# Altium PCB Flight Controller SoM.PcbDoc (part 2 of 3)
Units mm, origin at the board's own origin, x right, y up, seen from the top; angles counter-clockwise.
Board outline 55 x 40 mm, 8 copper layers (L1, L2, L3, L4, L5, L6, L7, L8), stack 1.028 mm thick; 176 components, 217 nets, 863 pads, 595 vias.
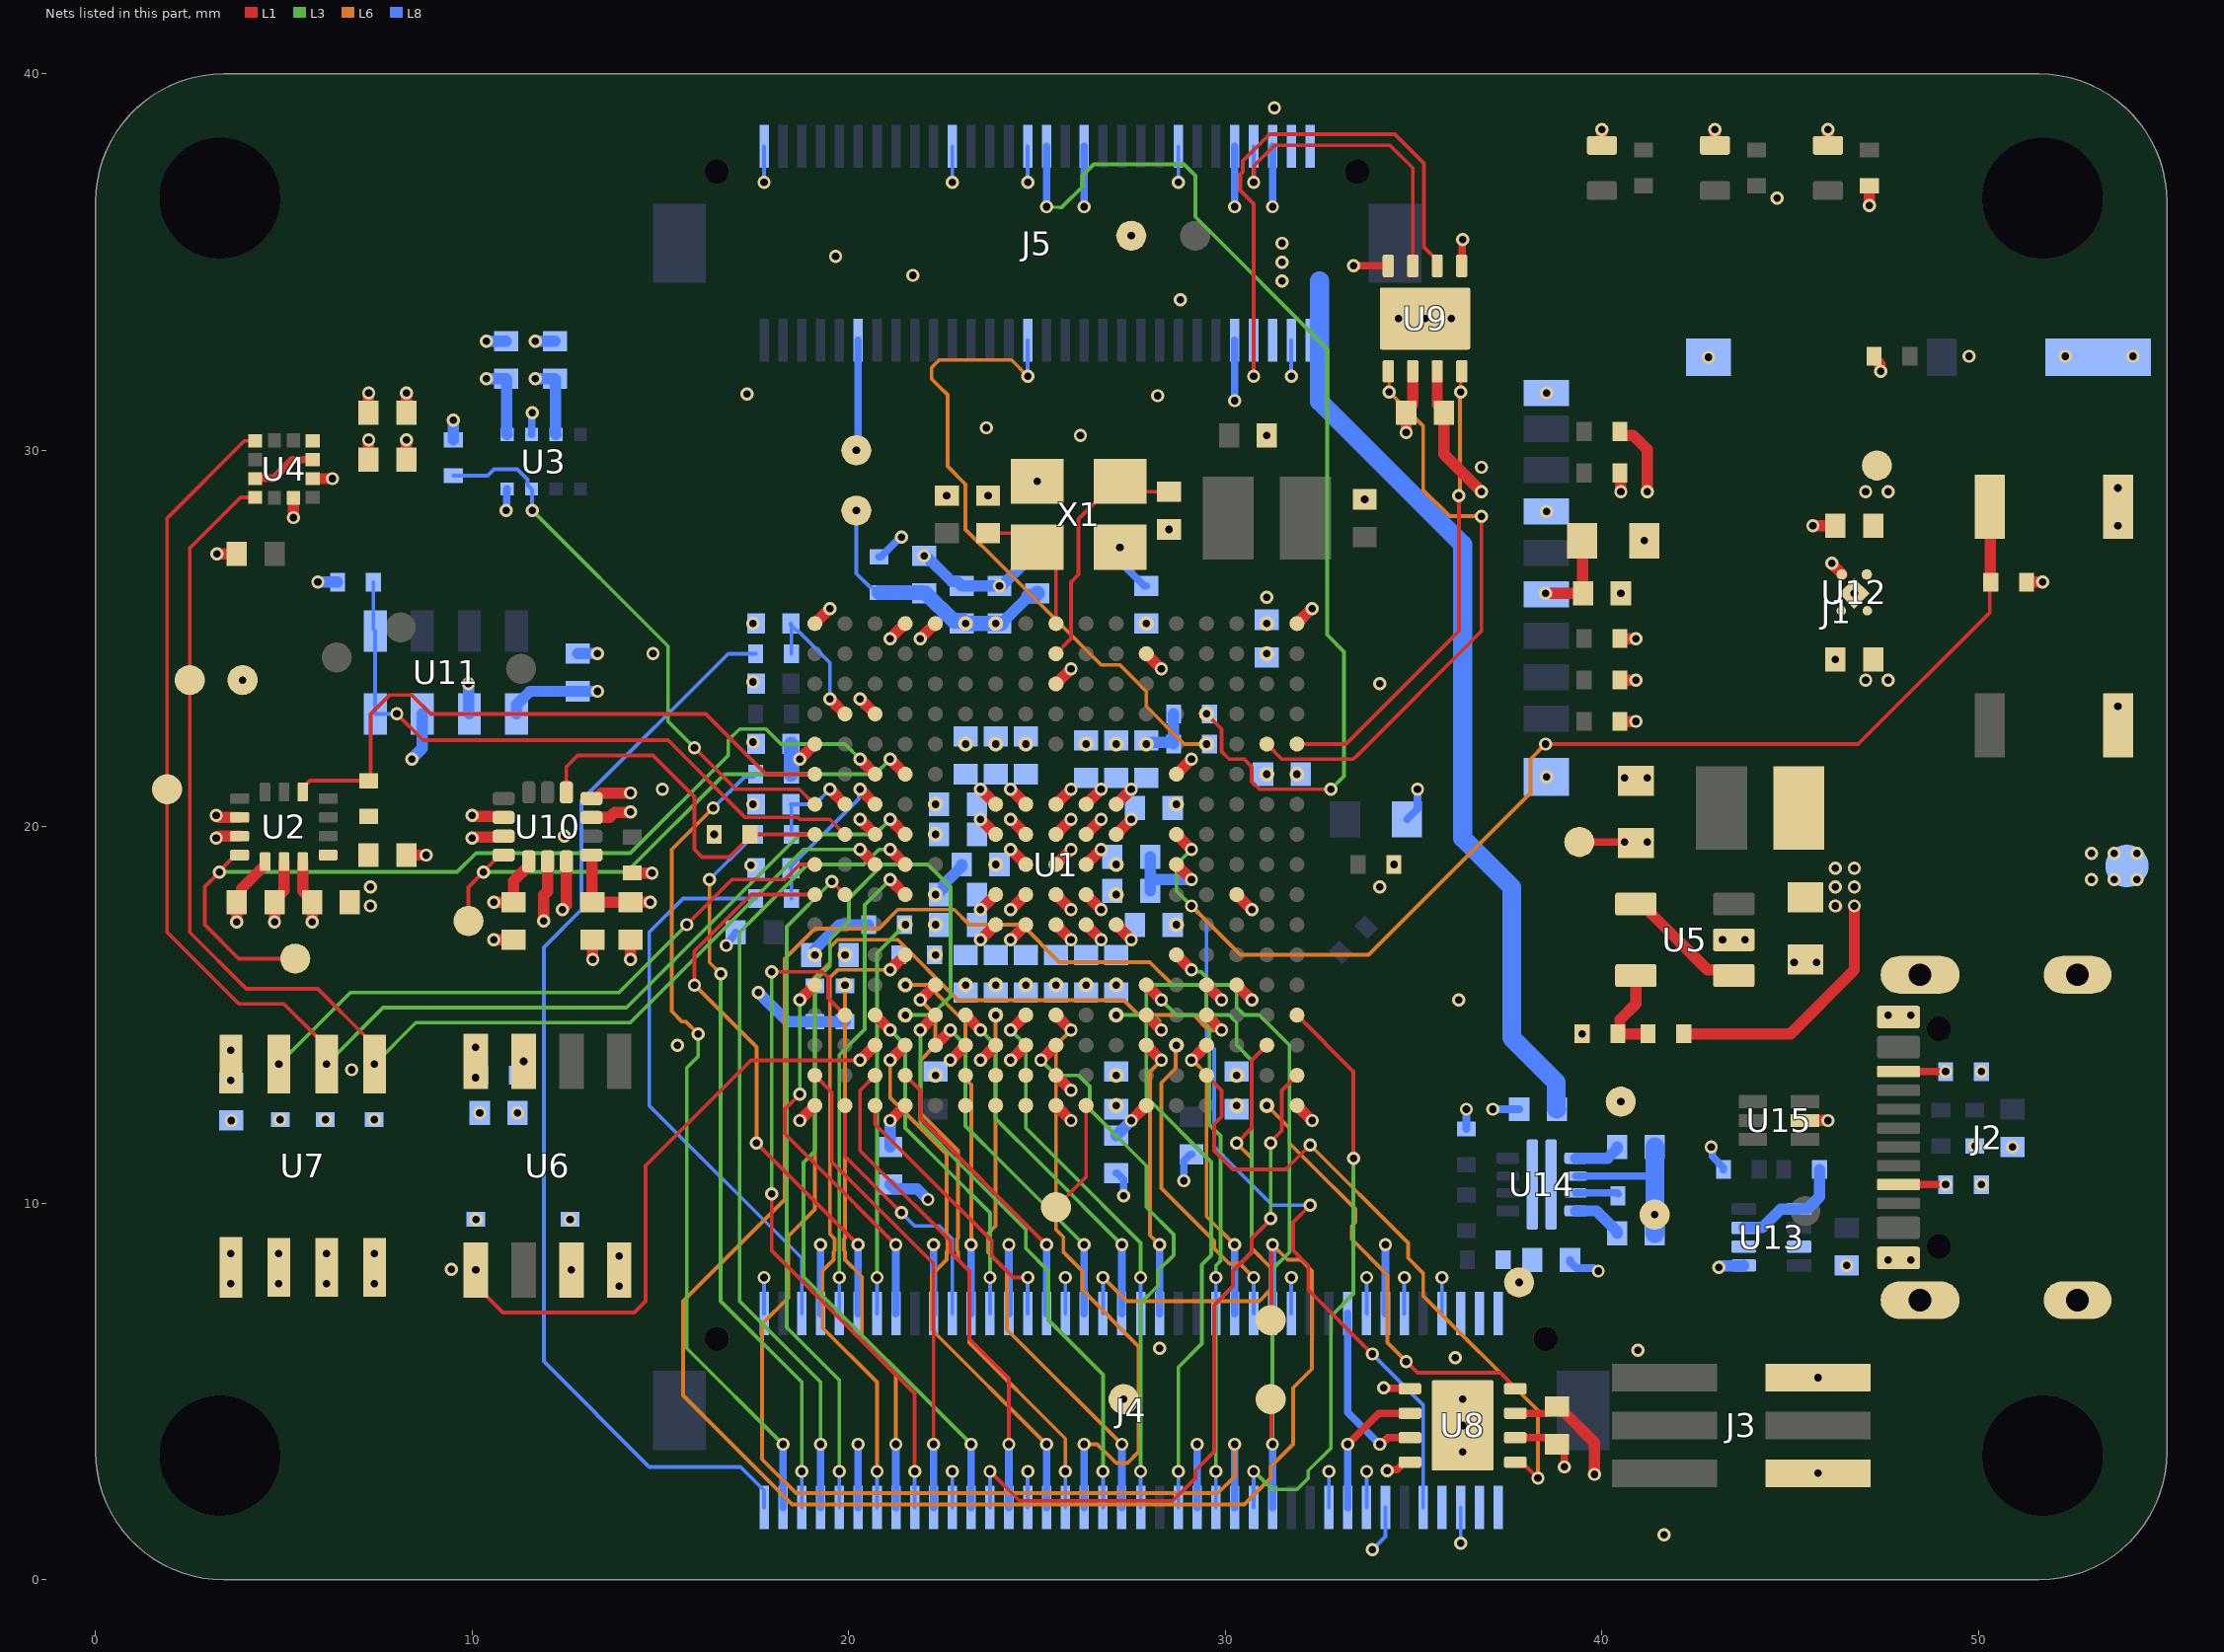
[diagram p8: the nets of this part, all layers, seen from the top]

## Part data
C1 C12: library part CMP-002-000094-5, "CAP 4u7 10V X5R 20% 0402", Dielectric=X5R, LCSC Part #=C23733, Manufacturer=Samsung, Manufacturer Part Number=CL05A475MP5NRNC, Package=0402, Tolerance=20%, Voltage=10V
C2 C3 C4 C5 C6 C7 C8 C9 C10 C11 C13 C14 C15 C16 C17 C18 C19 C20 C21 C22 C25 C26 C27 C28 C30 C33 C35 C36 C37 C43 C44 C45 C46 C47 C48 C49 C50 C51 C55 C68 C69 C78: library part CMP-002-000094-5, "CAP 100n 16V X7R 10% 0402", Dielectric=X7R, LCSC Part #=C1525, Manufacturer=Samsung, Manufacturer Part Number=CL05B104KO5NNNC, Package=0402, Tolerance=10%, Voltage=16V
C23 C52: library part CMP-002-000095-4, "CAP 10u 10V X5R 10% 0603", Dielectric=X5R, LCSC Part #=C19702, Manufacturer=Samsung, Manufacturer Part Number=CL10A106KP8NNNC, Package=0603, Tolerance=10%, Voltage=10V
C24 C34 C41 C42 C53 C54 C57 C58 C59 C60 C63: library part CMP-002-000094-5, "CAP 1u 25V X5R 10% 0402", Dielectric=X5R, LCSC Part #=C52923, Manufacturer=Samsung, Manufacturer Part Number=CL05A105KA5NQNC, Package=0402, Tolerance=10%, Voltage=25V
C29 C31 C32 C70: library part CMP-002-000094-5, "CAP 2u2 6.3V X5R 20% 0402", Dielectric=X5R, LCSC Part #=C12530, Manufacturer=Samsung, Manufacturer Part Number=CL05A225MQ5NSNC, Package=0402, Tolerance=20%, Voltage=6.3V
C38 C39: library part CMP-002-000094-5, "CAP 15p 50V C0G 5% 0402", Dielectric=C0G, LCSC Part #=C1548, Manufacturer=FH, Manufacturer Part Number=0402CG150J500NT, Package=0402, Tolerance=5%, Voltage=50V, Temperature Coefficient=C0G
C40: library part CMP-002-000094-5, "CAP 220p 50V X7R 10% 0402", Dielectric=X7R, LCSC Part #=C1530, Manufacturer=FH, Manufacturer Part Number=0402B221K500NT, Package=0402, Tolerance=10%, Voltage=50V, Temperature Coefficient=X7R
C56: library part CMP-002-000094-5, "CAP 220n 16V X7R 10% 0402", Dielectric=X7R, LCSC Part #=C16772, Manufacturer=Samsung, Manufacturer Part Number=CL05B224KO5NNNC, Package=0402, Tolerance=10%, Voltage=16V
C61: library part CMP-002-000094-5, "CAP 22n 50V X7R 10% 0402", Dielectric=X7R, LCSC Part #=C1532, Manufacturer=FH, Manufacturer Part Number=0402B223K500NT, Package=0402, Tolerance=10%, Voltage=50V
C64: library part CMP-002-000095-4, "CAP 10u 25V X5R 20% 0603", Dielectric=X5R, LCSC Part #=C96446, Manufacturer=Samsung, Manufacturer Part Number=CL10A106MA8NRNC, Package=0603, Tolerance=20%, Voltage=25V
C66: library part CMP-002-000095-4, "CAP 22u 6.3V X5R 20% 0603", Dielectric=X5R, LCSC Part #=C59461, Manufacturer=Samsung, Manufacturer Part Number=CL10A226MQ8NRNC, Package=0603, Tolerance=20%, Voltage=6.3V
C71 C77: library part CMP-002-000094-5, "CAP 10n 50V X7R 10% 0402", Dielectric=X7R, LCSC Part #=C15195, Manufacturer=Samsung, Manufacturer Part Number=CL05B103KB5NNNC, Package=0402, Tolerance=10%, Voltage=50V
C72 C73 C74 C75 C76: library part CMP-002-000000-4, "CAP 100n 16V X7R 10% 0402", Dielectric=X7R, LCSC Part #=C1525, Manufacturer=Samsung, Manufacturer Part Number=CL05B104KO5NNNC, Package=0402, Tolerance=10%, Voltage=16V, Design Item ID="Generic CAP 0402", Source=Schlib1.SchLib
D1 D2 D3: library part CMP-006-000012-1, "LED Yellow", Color=Yellow, Package=CASE, Component Type=Standard, Design Item ID=LED_YELLOW, Pin Count=2, Source="CRLS Lib.SchLib"
J1: library part CMP-031-000001-6, "PCB Connector, 8 Contact(s), 1 Row(s), Male, Right Angle, 0.043 inch Pitch, Surface Mount Terminal, Black Insulator, Receptacle"
J2: library part CMP-164-000056-1, "USB Connector Type C SMT 12 Pin", Manufacturer=GCT, Design Item ID=USB4105-GF-A-060, Distributor Link=https://eu.mouser.com/ProductDetail/GCT/USB4105-GF-A-060?qs=QNEnbhJQKvY2mocwNJzgfA%3D%3D, Manufacturer Part Number=USB4105-GF-A-060, Source=Schematic-Lib-PhilsLab.SchLib
J3: library part CMP-02761-000121-1, "CONN HEADER SMD 6POS 1.27MM", Housing Color=Black, Max Operating Temperature=125°C, Min Operating Temperature=-55°C, Contact Material=Bronze, Contact Plating=Gold, Depth=3.42mm, Gender=Male, Housing Material=Polymer, Length=3.81mm, Number of Contacts=6, Number of Rows=2, Orientation=Straight, Packaging="Tape and Reel", Pitch=1.27mm, Radiation Hardening=No, REACH SVHC="No SVHC", RoHS Compliant=Yes, Termination=Solder
J4: library part CMP-003-000029-3, "Board-To-Board Connector, DF17 Series, Surface Mount, Header, 80, 0.5 mm, Gold Plated Contacts", Package=None, Check_prices=https://www.snapeda.com/parts/DF17(4.0)-80DP-0.5V(57)/Hirose/view-part/?ref=eda, Component Type=Standard, Design Item ID=DF17(4.0)-80DP-0.5V(57), MF="Hirose Electric", MP=DF17(4.0)-80DP-0.5V(57), Pin Count=80, SnapEDA_Link=https://www.snapeda.com/parts/DF17(4.0)-80DP-0.5V(57)/Hirose/view-part/?ref=snap, Source=DF17(4.0)-80DP-0.5V(57).SchLib
J5: library part CMP-003-000030-2, "60 Position Connector Header, Outer Shroud Contacts Surface Mount Gold", Package=None, Check_prices=https://www.snapeda.com/parts/DF17(4.0)-60DP-0.5V(57)/Hirose/view-part/?ref=eda, Component Type=Standard, Design Item ID=DF17(4.0)-60DP-0.5V(57), MF="Hirose Electric", MP=DF17(4.0)-60DP-0.5V(57), Pin Count=60, SnapEDA_Link=https://www.snapeda.com/parts/DF17(4.0)-60DP-0.5V(57)/Hirose/view-part/?ref=snap, Source=DF17(4.0)-60DP-0.5V(57).SchLib
L1 L2: library part CMP-06042-014676-1, "Shielded Wirewound Inductor 2.2uH 20% 2300mA 0.082Ω 1008 (2520)", Case Code (Imperial)=1008, Case Code (Metric)=2520, Current Rating=2.3A, DC Resistance (DCR)=82mR, Inductance=2.2uH, Max Operating Temperature=125°C, Min Operating Temperature=-40°C, Saturation Current=3.6A, Test Frequency=1MHz, Tolerance=20%, Manufacturer=Murata, Manufacturer Part Number=DFE252012F-2R2M=P2, Case/Package=1008, Core Material=Ferrite, Height - Seated (Max)=0.047inch, Length=0.098inch, Mount="Surface Mount", Packaging="Tape and Reel", Shielding=Shielded, Width=0.079inch, Package=2520
MH1 MH2 MH3 MH4: library part CMP-00043-8, "Mounting hole, M3, non-plated, Ø3.2 mm finished hole, Ø6.0 mm solder mask opening (bare FR-4), Ø6.2 mm copper keepout all layers, electrically isolated"
R1: library part CMP-008-000000-2, "RES 10R 1% 1/16W 0402", LCSC Part #=C17168, Manufacturer=UNI-ROYAL, Manufacturer Part Number=0402WGF100JTCE, Package=0402, Power=1/16W, Tolerance=1%, Design Item ID="Generic RES 0402", Source=Schlib1.SchLib
R2 R3 R4 R5 R6 R7 R8 R11 R12 R13 R14 R21 R22 R33 R34 R41: library part CMP-008-000000-2, "RES 10k 1% 1/16W 0402", LCSC Part #=C25744, Manufacturer=UNI-ROYAL, Manufacturer Part Number=0402WGF1002TCE, Package=0402, Power=1/16W, Tolerance=1%, Design Item ID="Generic RES 0402", Source=Schlib1.SchLib
R9: library part CMP-008-000000-2, "RES 22R 1% 1/16W 0402", LCSC Part #=C25092, Manufacturer=UNI-ROYAL, Manufacturer Part Number=0402WGF220JTCE, Package=0402, Power=1/16W, Tolerance=1%, Design Item ID="Generic RES 0402", Source=Schlib1.SchLib
R10: library part CMP-008-000000-2, "RES 0R 1% 1/16W 0402", LCSC Part #=C17168, Manufacturer=UNI-ROYAL, Manufacturer Part Number=0402WGF0000TCE, Package=0402, Power=1/16W, Tolerance=1%, Design Item ID="Generic RES 0402", Source=Schlib1.SchLib
R15 R16 R35 R36 R37 R38 R39 R40: library part CMP-008-000000-2, "RES 2k2 1% 1/16W 0402", LCSC Part #=C25879, Manufacturer=UNI-ROYAL, Manufacturer Part Number=0402WGF2201TCE, Package=0402, Power=1/16W, Tolerance=1%, Design Item ID="Generic RES 0402", Source=Schlib1.SchLib
R17: library part CMP-008-000000-2, "RES 357k 1% 1/16W 0402", LCSC Part #=C27005, Manufacturer=UNI-ROYAL, Manufacturer Part Number=0402WGF3573TCE, Package=0402, Power=1/16W, Tolerance=1%, Design Item ID="Generic RES 0402", Source=Schlib1.SchLib
R18: library part CMP-008-000000-2, "RES 249k 1% 1/16W 0402", LCSC Part #=C25774, Manufacturer=UNI-ROYAL, Manufacturer Part Number=0402WGF2493TCE, Package=0402, Power=1/16W, Tolerance=1%, Design Item ID="Generic RES 0402", Source=Schlib1.SchLib
R19: library part CMP-008-000000-2, "RES 3k 1% 1/16W 0402", LCSC Part #=C25784, Manufacturer=UNI-ROYAL, Manufacturer Part Number=0402WGF3001TCE, Package=0402, Power=1/16W, Tolerance=1%, Design Item ID="Generic RES 0402", Source=Schlib1.SchLib
R20: library part CMP-008-000000-2, "RES 33k2 1% 1/16W 0402", LCSC Part #=C26976, Manufacturer=UNI-ROYAL, Manufacturer Part Number=0402WGF3322TCE, Package=0402, Power=1/16W, Tolerance=1%, Design Item ID="Generic RES 0402", Source=Schlib1.SchLib
R23 R24 R25 R42 R43 R44 R45 R46: library part CMP-008-000000-2, "RES 1k 1% 1/16W 0402", LCSC Part #=C11702, Manufacturer=UNI-ROYAL, Manufacturer Part Number=0402WGF1001TCE, Package=0402, Power=1/16W, Tolerance=1%, Design Item ID="Generic RES 0402", Source=Schlib1.SchLib
R26 R29: library part CMP-008-000000-2, "RES 100k 1% 1/16W 0402", LCSC Part #=C25741, Manufacturer=UNI-ROYAL, Manufacturer Part Number=0402WGF1003TCE, Package=0402, Power=1/16W, Tolerance=1%, Design Item ID="Generic RES 0402", Source=Schlib1.SchLib
R27: library part CMP-008-000000-2, "RES 110k 1% 1/16W 0402", LCSC Part #=C25742, Manufacturer=UNI-ROYAL, Manufacturer Part Number=0402WGF1103TCE, Package=0402, Power=1/16W, Tolerance=1%, Design Item ID="Generic RES 0402", Source=Schlib1.SchLib
R28: library part CMP-008-000000-2, "RES 453k 1% 1/16W 0402", LCSC Part #=C170322, Manufacturer=Walsin, Manufacturer Part Number=WR04X4533FTL, Package=0402, Power=1/16W, Tolerance=1%, Design Item ID="Generic RES 0402", Source=Schlib1.SchLib
R31 R32: library part CMP-008-000000-2, "RES 5k1 1% 1/16W 0402", LCSC Part #=C25905, Manufacturer=UNI-ROYAL, Manufacturer Part Number=0402WGF5101TCE, Package=0402, Power=1/16W, Tolerance=1%, Design Item ID="Generic RES 0402", Source=Schlib1.SchLib
R47: library part CMP-008-000000-2, "RES 10k 1% 1/16W 0402", Package=0402, Power=1/16W, Manufacturer Part Number=0402WGF1002TCE, LCSC Part #=C25744, Tolerance=1%, Manufacturer=UNI-ROYAL, Source=Schlib1.SchLib, Design Item ID="Generic RES 0402"
R48: library part CMP-008-000000-2, "RES 15k 1% 1/16W 0402", LCSC Part #=C25756, Manufacturer=UNI-ROYAL, Manufacturer Part Number=0402WGF1502TCE, Package=0402, Power=1/16W, Tolerance=1%, Design Item ID="Generic RES 0402", Source=Schlib1.SchLib
SW1 SW2: library part CMP-2100-03586-2, "SWITCH TACTILE SPST-NO 0.05A 12V", Contact Current Rating=50mA, Contact Resistance=100mR, Insulation Resistance=100MR, Max Operating Temperature=70°C, Max Voltage Rating (DC)=12V, Min Operating Temperature=-25°C, Operating Force=1.5N, Package Quantity=1, Ratings="Dust Proof", Actuator Length=0.4mm, Actuator Type=Standard, Contact Material=Silver, Current Rating=50mA, Depth=2.5mm, Electrical Life=200000Cycles, Height=1.2mm, Illumination Type=Non-Illuminated, Lead Free="Lead Free", Length=4mm, Max Current Rating=50mA, Mechanical Life=200000Cycles, Mount="Surface Mount", Orientation=Straight, Packaging="Tape and Reel", Switch Function=Off-Mom, Switch Travel=0.15mm, Termination=SMD/SMT, Throw Configuration=SPST, Voltage Rating (DC)=12V, Weight=0.000776oz, Width=3mm
TP1 TP2 TP3 TP4 TP5 TP6 TP7 TP8 TP9 TP10 TP11 TP12 TP13 TP14 TP15 TP16 TP17 TP18 TP19 TP20 TP21 TP22: library part CMP-092-000000-4, Design Item ID=TP, Source=Testpoint.SchLib
U1: library part CMP-029-000010-1, "MCU 32-bit ARM Cortex M7/M4 RISC 2MB Flash 3.3V 265-Pin TFBGA Tray", Component Type=Standard, Design Item ID=MCU_STM32H757XIH6, Pin Count=265, Source="CRLS Lib.SchLib"
U2: library part CMP-292-000005-1, "IMU, 6-axis, +/-32 g, +/-4000 dps, SPI/I2C, LGA-14", Component Type=Standard, Design Item ID=IMU_LSM6DSV32X, Pin Count=14, Source="CRLS Lib.SchLib"
U3: library part CMP-292-000000-1, "DIGITAL PRESSURE SENSOR", Ambient Temperature Range High=+85°C, Ambient Temperature Range Low=-40°C, Manufacturer=Infineon, Max Supply Voltage=3.6V, Min Supply Voltage=1.2V, Operating Supply Current=345uA, Package=PG-VLGA-8, Temperature="-40°C to +85°C", Temperature Range High=85°C, Automotive=No, Category=IC, Component Type=Standard, Design Item ID=BARO_DPS368XTSA1, Device Class L1=Sensors, Device Class L2="Pressure Sensors", Device Class L3=unset, Digikey Description="DIGITAL PRESSURE SENSOR", Footprint Url=https://www.infineon.com/cms/en/product/packages/PG-VLGA/PG-VLGA-8-2/, Height=1.1mm, Lead Free=Yes, Manufacturer Part Number=DPS368XTSA1, Octopart=https://octopart.com/dps368xtsa1-infineon-98278029, Pin Count=8, Port Style="No Port", RoHS=TRUE, Sensor Output=I2C,SPI, Source="CRLS Lib.SchLib", Temperature Range Low=-40°C
U4: library part CMP-12173-000002-1, "SENSOR MR I2C/SPI 12LGA", Manufacturer=STMicroelectronics, Max Supply Voltage=3.6V, Min Supply Voltage=1.71V, Operating Supply Current=50-200uA, Package=LGA-12-DM00170568, Temperature="-40°C to +85°C", Temperature Range High=+85°C, Temperature Range Low=-40°C, Automotive=No, Category=IC, ComponentLink2Description=Datasheet, ComponentLink2URL=https://www.st.com/resource/en/datasheet/lis2mdl.pdf, Device Class L1=Sensors, Device Class L2="Magnetic Sensors", Device Class L3=unset, Digikey Description="SENSOR MR I2C/SPI 12LGA", Height=0.7mm, Lead Free=Yes, Manufacturer Part Number=LIS2MDLTR, Octopart=https://octopart.com/lis2mdltr-stmicroelectronics-81117311, RoHS=TRUE, Sensing Method=Magnetic, Sensor Output=I2C,SPI
U5: library part CMP-04918-000387-1, "IC REG BUCK ADJ 2A SOT23-5", Output Current=2A, Min Output Voltage=600mV, Min Operating Temperature=-40°C, Max Output Voltage=5.5V, Max Operating Temperature=125°C, Case/Package=SOT-23-5, Switching Frequency=1.5MHz, Min Input Voltage=2.5V, Output Configuration=Positive, Mount="Surface Mount", Packaging="Cut Tape", Output Type=Adjustable, RoHS Compliant=Yes, Synchronous Rectifier=Yes, Max Input Voltage=5.5V
U6: library part CMP-029-000014-5, "F-RAM, 256-Kbit (32K x 8), SPI, SOIC-8", Manufacturer="Infineon Technologies", Design Item ID=FM25V02A-GTR, Manufacturer Order Number=FM25V02A-GTR, PackageReference=PG-DSO-8-802, Source=FM25V02A-GTR.SchLib
U7: library part CMP-057-000000-5, "EEPROM Serial-I2C 64K-bit 8K x 8 2.5V/3.3V/5V 8-Pin SOIC T/R", Package=None, Availability=Unavailable, Component Type=Standard, Design Item ID=M24C64-RMN6TP, MP=altium_native_batch, Pin Count=8, Price=None, Source=M24C64-RMN6TP.SchLib
U8 U9: library part CMP-322-000000-2, "1/1 Transceiver Half CANbus 8-SON (3x3)", Package=None, Check_prices=https://www.snapeda.com/parts/TCAN3414DRBR/Texas+Instruments/view-part/?ref=eda, Component Type=Standard, Design Item ID=TCAN3414DRBR, MF="Texas Instruments", MP=TCAN3414DRBR, Pin Count=9, SnapEDA_Link=https://www.snapeda.com/parts/TCAN3414DRBR/Texas+Instruments/view-part/?ref=snap, Source=TCAN3414DRBR.SchLib
U10: library part CMP-195-000000-1, "Accelerometer, Gyroscope, 6 Axis Sensor Output", Package=None, Availability=Unavailable, Component Type=Standard, Design Item ID=ICM-42688-P, MP=ICM-42688-P, Pin Count=14, Price=None, Source=ICM-42688-P.SchLib
U11: library part CMP-325-000000-2, "MS5611 BAROMETRIC SENSOR CM T&R", Manufacturer_Name="TE Connectivity", Copyright="Copyright (C) 2026 Ultra Librarian. All rights reserved.", Design Item ID=MS561101BA03-50, Manufacturer_Part_Number=MS561101BA03-50, RefDes=RefDes, Source=MS561101BA03-50.SchLib, Type=Type
U12: library part CMP-341-000000-2, "300mA ultra-low-noise low-IQ low-dropout (LDO) linear regulator with high PSRR 4-X2SON -40 to 125", Manufacturer_Name="Texas Instruments", Copyright="Copyright (C) 2025 Ultra Librarian. All rights reserved.", Design Item ID=TPS7A2033DQNR, Manufacturer_Part_Number=TPS7A2033DQNR, RefDes=RefDes, Source=TPS7A2033DQNR.SchLib, Type=TYPE
U13: library part CMP-110-000001-1, "Power mux, 1.6 V to 5.5 V, 2.5 A, priority select", Package=None, Check_prices=https://www.snapeda.com/parts/TPS2116DRLR/Texas+Instruments/view-part/?ref=eda, Component Type=Standard, Design Item ID=TPS2116DRLR, MF="Texas Instruments", MP=TPS2116DRLR, Pin Count=8, SnapEDA_Link=https://www.snapeda.com/parts/TPS2116DRLR/Texas+Instruments/view-part/?ref=snap, Source=TPS2116DRLR.SchLib
U14: library part CMP-334-000000-1, "eFuse, 2.7 V to 23 V, 5.5 A, reverse current blocking", Package="VFQFN-10 Texas Instruments", Check_prices=https://www.snapeda.com/parts/TPS259474ARPWR/Texas+Instruments/view-part/?ref=eda, Component Type=Standard, Design Item ID=TPS259474ARPWR, MF="Texas Instruments", MP=TPS259474ARPWR, Pin Count=10, SnapEDA_Link=https://www.snapeda.com/parts/TPS259474ARPWR/Texas+Instruments/view-part/?ref=snap, Source=TPS259474ARPWR.SchLib
U15: library part CMP-006-000005-3, "ESD protection, 2 data lines and VBUS, SOT-666", Package="SOT-563 STMicroelectronics", Availability=Unavailable, Component Type=Standard, Design Item ID=USBLC6-2P6, MF=STMicroelectronics, MP=USBLC6-2P6, Pin Count=6, Price=None, SnapEDA_Link=https://www.snapeda.com/parts/USBLC6-2P6/STMicroelectronics/view-part/106846/?ref=snap, Source=SnapEDAsch.SchLib
X1: library part CMP-004-000000-2, "Crystal, 25 MHz, 10 ppm, 3225", Frequency Stability=±30ppm, Frequency Tolerance=±10ppm, JLCPCB Part Class="Basic Part", LCSC Part Name="25MHz ±10ppm 12pF", Manufacturer=YXC(扬兴晶振), Manufacturer Part=X322525MOB4SI, Add into BOM=yes, Convert to PCB=yes, Crystal Type="SMD Crystal Resonator", Datasheet=https://atta.szlcsc.com/upload/public/pdf/source/20210329/C112971_1F611BDC486E193C1706F6D8EB5AA189.pdf, Design Item ID="Crystal 25MHz X322525MOB4SI", Device=X322525MOB4SI, Source=Schlib1.SchLib, Supplier Footprint=SMD3225-4P, Supplier Part=C9006, Symbol=X322525MOB4SI

## Via types
v1: diameter 0.35, hole 0.2, L1 to L8, tented both sides, 595 vias

## Nets (pads, with @x,y where several pads share a name; then routed paths per layer and width w, separated by ;. In a path a pad name is that pad's centre, name@x,y a point inside that pad or via, vN(x,y) a via of type N, cw(c..) or ccw(c..) an arc to the next point about the centre after c; other vN are vias at no path point)
+3V3LDO: C44.1 C45.1 C50.1 C51.1 C53.1 C54.1 C55.1 C59.1 C68.1 C69.1 C70.1 C71.1 R21.2 R22.2 R33.1 R34.2 TP6.1 U2.5 U2.8 U3.6 U3.8 U4.3 U4.9 U4.10 U10.5 U10.8 U11.1 U12.1 | length 16.9
  L1 w0.2: U4.3@4.237,29.25 4.25,29.263 4.725,29.263 5.212,29.75 U4.9@5.763,29.75
  L1 w0.3: v1(3.75,17.475) C45.1@3.75,18 3.87,18.12 3.87,18.356 4.5,18.986 U2.5@4.5,19.075 ; C53.1@7.25,29.75 v1(7.25,30.275) ; C55.1@7.25,31 v1(7.25,31.525) ; v1(10.575,18) C71.1@11.1,18 11.1,18.565 11.475,18.94 11.5,18.965 U10.5@11.5,19.085 ; U10.8@13.165,19.25 13.183,19.232 13.183,18.018 C70.1@13.2,18 C69.1@14.2,18 v1(14.725,18)
  L8 w0.3: v1(5.9,26.5) R33.1@6.425,26.5 ; R21.2@9.5,30.275 v1(9.5,30.8) ; v1(10.375,31.9) C51.1@10.9,31.9 10.913,31.888 10.913,30.438 U3.8@10.925,30.425 ; U11.1@11.175,23 11.175,23.241 11.534,23.6 C68.1@12.8,23.6 v1(13.325,23.6) ; v1(11.675,31.9) C50.1@12.2,31.9 12.213,31.888 12.213,30.438 U3.6@12.225,30.425
  other v1: 7.3,17.9 7.3,18.4 16.425,19.8 47,28.9 47.6,28.9
+5V_EFUSE: C63.1 J5.59 J5.60 R18.2 TP4.1 U13.3 U13.5 U14.6 | length 27.7
  L8 w0.3: U13.3@43.765,9.35 43.775,9.36 44.26,9.36 44.741,9.841 45.226,9.841 45.245,9.86 45.46,9.86 45.775,10.175 R18.2@45.775,10.9
  L8 w0.5: 32.5,34.5 32.5,32.925 32.5,31.3 36.3,27.5 36.3,19.7 37.6,18.4 37.6,14.4 38.78,13.22 38.78,12.52 C63.1@38.8,12.5
  other v1: 40.5,12.7
+A3V3: C33.1 C35.1 C41.1 C42.1 R1.1 TP9.1 U1.L1 U1.M1 | length 7.3
  L8 w0.1: v1(20.2,28.4) 20.2,27 20.2,26.725 20.55,26.375 20.6,26.375 20.75,26.225 R1.1@20.8,26.225
  L8 w0.3: C33.1@24.05,25.4 C42.1@24.78,26.13
  L8 w0.4: R1.1@20.8,26.225 21.975,26.225 C41.1@22,26.2 ; C41.1@22.05,26.2 22.78,25.47 23.03,25.47 v1(23.1,25.4) v1(23.9,25.4) C33.1@24.05,25.4 ; C42.1@24.78,26.13 24.93,26.13 C42.1@25,26.2
+D3V3: C1.1 C2.1 C3.1 C4.1 C5.1 C6.1 C7.1 C8.1 C9.1 C10.1 C11.1 C12.1 C13.1 C14.1 C15.1 C16.1 C17.1 C18.1 C19.1 C20.1 C21.1 C22.1 C25.1 C26.1 C27.1 C28.1 C30.1 C34.1 C37.1 C43.1 C46.1 C47.1 C48.1 C49.1 C52.1 C66.1 J1.4 J3.1 J4.74 J4.75 J5.56 J5.57 L2.2 R1.2 R2.2 R3.2 R4.2 R6.2 R7.2 R8.2 R11.2 R12.2 R13.2 R14.2 R15.2 R16.2 R23.2 R28.2 R35.2 R36.2 R37.2 R38.2 R39.2 R40.2 R41.2 SW1.2 U1.A6 U1.B1 U1.C17 U1.E6 U1.E7 U1.E9 U1.E11 U1.F1 U1.F5 U1.F17 U1.G5 U1.G13 U1.G17 U1.H5 U1.H13 U1.J13 U1.K5 U1.K13 U1.L5 U1.L13 U1.M5 U1.M13 U1.N7 U1.N8 U1.N10 U1.N11 U1.N12 U1.P17 U1.U12 U6.8 U7.8 U8.3 U9.3 | length 34.8
  L1 w0.2: U8.3@37.7,4.425 38.575,4.425 38.75,4.6 C48.1@38.8,4.6
  L1 w0.3: v1(21.1,12.2) U1.P17@21.5,12.6 ; v1(27.5,12.2) U1.F17@27.9,12.6 ; U1.E9@28.7,19 v1(29.1,18.6) ; U1.E6@28.7,21.4 v1(29.1,21.8) ; U9.3@35.625,32.1 35.625,31.225 C49.1@35.8,31.05 ; C49.1@35.8,31 35.8,29.9 v1(36.8,28.9) ; v1(38.5,26.2) C43.1@39.5,26.2 39.488,26.213 39.488,27.588 C52.1@39.475,27.6 ; C48.1@38.8,4.6 38.92,4.48 38.97,4.48 39.8,3.65 v1(39.8,2.8) ; R4.2@40.475,22.8 v1(40.9,22.8) ; R3.2@40.475,23.9 v1(40.9,23.9) ; R2.2@40.475,25 v1(40.9,25) ; R7.2@40.475,29.4 40.475,29.315 40.49,29.3 40.49,28.91 v1(40.5,28.9) ; R6.2@40.475,30.5 40.475,30.45 40.525,30.4 40.825,30.4 41.2,30.025 v1(41.2,28.9) ; R28.2@42.175,14.5 43.6,14.5 45,14.5 46.7,16.2 v1(46.7,17.9) ; v1(46.2,17.9) 46.214,17.9 v1@46.239,17.875 ; v1(47.1,36.5) R23.2@47.1,37.025 ; R8.2@47.225,32.5 47.225,32.45 47.39,32.285 47.39,32.11 v1(47.4,32.1)
  L8 w0.2: R1.2@20.8,27.175 20.85,27.175 21.375,27.7 v1(21.4,27.7)
  L8 w0.3: v1(17.6,15.6) 18.375,14.825 R37.2@19.1,14.825 R38.2@19.9,14.825 ; v1(19.1,16.6) 19.1,16.75 19.75,17.4 R35.2@20.525,17.4 ; C28.1@21.1,11.5 v1(21.1,12.2) ; v1(22.3,18.2) 22.35,18.2 22.52,18.37 22.52,18.47 23,18.95 C6.1@23,19 ; C34.1@27.1,11.8 v1(27.5,12.2) ; v1(27.9,22.2) 27.95,22.25 28.575,22.25 R39.2@28.625,22.2 R40.2@28.625,23 ; C12.1@28,18.3 28,18.7 ; C3.1@28,19.2 28,18.7 ; v1(29.1,18.6) 28.1,18.6 28,18.7
  other v1: 45.735,2.83 36.1,5.9 10.1,9.575 12.6,9.575 4.9,12.225 6.1,12.225 7.4,12.225 10.2,12.4 27.1,12.6 30.3,12.6 3.59,13.27 10.09,13.34 3.59,14.07 10.09,14.14 23.1,15.8 23.9,15.8 24.7,15.8 25.5,15.8 26.3,15.8 27.1,15.8 22.3,16.6 22.3,17.4 28.7,17.4 46.2,18.4 46.7,18.4 46.2,18.9 46.7,18.9 34.475,19 22.3,19.8 22.3,20.6 28.7,20.6 31.9,21.4 23.1,22.2 23.9,22.2 24.7,22.2 26.3,22.2 27.1,22.2 27.9,25.4 31.1,25.4 53.7,28 53.7,29 31.5,34.5 31.5,35 31.5,35.5
+VCARRIER: C57.1 J4.77 J4.78 J4.79 J4.80 R17.2 TP3.1 U14.5
  other v1: 37.8,7.9
+VMUX: C60.1 C64.1 TP5.1 U5.1 U5.4 U12.3 U12.4 U13.2 U13.7 | length 5
  L1 w0.2: TP5.1@39.4,19.6 40.875,19.6 C64.1@40.9,19.575
  L1 w0.3: U5.4@40.9,17.95 41.15,17.95 41.3,17.8 41.3,17.7 42.8,16.2 43.35,16.2 U5.1@43.5,16.05
  other v1: 40.6,19.6 41.2,19.6 47,23.9 47.6,23.9
BARO1_CS: R21.1 U1.U7 U3.2 | length 14.9
  L1 w0.1: v1(15.9,22.1) 17,21 18.687,21 19.087,20.6 U1.U7@19.1,20.6
  L3 w0.1: v1(11.6,28.4) 15.2,24.8 15.2,22.8 v1(15.9,22.1)
  L8 w0.1: R21.1@9.5,29.325 10.409,29.325 10.584,29.5 11.2,29.5 11.475,29.225 11.475,29.075 11.588,28.962 11.588,28.413 v1(11.6,28.4)
BARO2_CS: R33.2 U1.T8 U11.4 U11.5 | length 17.3
  L1 w0.1: v1(8,23) 8.7,22.3 15.2,22.3 17.25,20.25 18.65,20.25 18.7,20.2 19.5,20.2 U1.T8@19.9,19.8
  L8 w0.1: R33.2@7.375,26.5 7.375,25.25 U11.5@7.425,25.2 U11.4@7.425,23 v1(8,23)
BATT_I_SENSE: C74.1 R44.1 U1.R7 | length 4.2
  L1 w0.3: v1(20.3,21) U1.R7@20.7,20.6
  L8 w0.1: R44.1@18.475,18.1 18.475,18.885 C74.1@18.46,18.9 18.46,18.94 20.262,20.742 20.262,20.962 v1(20.3,21)
BATT_I_SENSE_F: J4.5 R44.2 | length 15
  L8 w0.1: R44.2@17.525,18.1 17.5,18.1 15.6,18.1 14.7,17.2 14.7,12.6 18.75,8.55 J4.5@18.75,7.075
BATT_V_SENSE: C75.1 R45.1 U1.T7 | length 2.6
  L1 w0.3: v1(19.5,21) U1.T7@19.9,20.6
  L8 w0.1: R45.1@18.475,19.8 18.475,20.585 C75.1@18.46,20.6 19.1,20.6 v1(19.5,21)
BATT_V_SENSE_F: J4.6 R45.2 | length 19.4
  L3 w0.1: v1(16.6,16.1) 16.6,7.4 18.75,5.25 v1(18.75,2.88)
  L6 w0.1: v1(16.3,18.6) 16.3,16.4 v1(16.6,16.1)
  L8 w0.1: v1(16.3,18.6) 17.3,19.6 17.375,19.6 17.525,19.75 R45.2@17.525,19.8 ; J4.6@18.75,1.925 v1(18.75,2.88)
BOOT0: J4.72 R5.2 SW1.1 U1.E8 | length 50.7
  L1 w0.1: v1(32.25,9.95) 31.8,9.5 31.8,8.75 32.2,8.35 32.2,7.7 v1(33.9,6) ; v1(38.5,22.2) 46.8,22.2 50.3,25.7 50.3,26.5 R5.2@50.325,26.5
  L1 w0.3: U1.E8@28.7,19.8 v1(29.1,19.4) ; SW1.1@50.3,28.5 50.313,28.487 50.313,26.512 R5.2@50.325,26.5
  L3 w0.1: v1(29.1,17.9) 28.7,18.3 28.7,19 v1(29.1,19.4)
  L6 w0.1: v1(29.1,17.9) 30.4,16.6 33.5,16.6 33.8,16.6 38.1,20.9 38.1,21.8 v1(38.5,22.2)
  L8 w0.1: v1(29.1,17.9) 29.5,17.5 29.5,14.3 29.7,14.1 29.7,11.5 30.2,11 31.25,9.95 v1(32.25,9.95) ; v1(33.9,6) 35.25,4.65 J4.72@35.25,1.925
BUZZER: J4.46 U1.G14 | length 14.8
  L3 w0.1: v1(27.1,15) 27.7,15 27.9,14.8 27.9,12.824 29.625,11.099 29.625,11 29.625,8.625 29.375,8.375 29.375,6.275 28.75,5.65 v1(28.75,2.88)
  L8 w0.1: J4.46@28.75,1.925 v1(28.75,2.88)
CAN1_N: J4.64 U8.6 | length 3.7
  L1 w0.2: v1(33.25,3.6) 34.075,4.425 U8.6@34.9,4.425
  L8 w0.2: J4.64@33.25,1.925 v1(33.25,3.6)
CAN1_P: J4.63 U8.7 | length 4.7
  L1 w0.2: v1(34.1,3.6) 34.141,3.6 34.316,3.775 U8.7@34.9,3.775
  L8 w0.2: J4.63@33.25,7.075 33.25,4.45 v1(34.1,3.6)
CAN1_RX: U1.B17 U8.4 | length 11.6
  L1 w0.1: v1(34.8,5.8) 35.1,5.5 37.3,5.5 37.7,5.1 U8.4@37.7,5.075
  L6 w0.1: v1(31.1,12.6) 31.7,12 31.7,11.6 32.3,11 33.45,9.85 33.45,9.5 33.35,9.4 33.35,9.05 34.3,8.1 34.3,6.3 v1(34.8,5.8)
CAN1_TX: U1.D16 U8.1 | length 17.4
  L1 w0.1: U1.D16@29.5,13.4 29.9,13 29.9,12.3 29.7,12.1 29.7,11.4 30.2,10.9 31.6,10.9 31.7,11 v1(32.25,11.55) ; U8.1@37.7,3.125 37.8,3.025 37.975,3.025 v1(38.3,2.7)
  L6 w0.1: v1(32.25,11.55) 34.85,8.95 34.85,8.55 35.25,8.15 35.25,7.55 38.3,4.5 v1(38.3,2.7)
CAN2_N: J5.54 U9.6 | length 15.1
  L1 w0.1: v1(30.75,31.97) 30.75,36.55 30.4,36.9 30.4,37.336 30.465,37.401 30.465,37.69 31.176,38.4 34.5,38.4 35.275,37.625 35.275,35.4 35.625,35.05 U9.6@35.625,34.9
  L8 w0.1: v1(30.75,31.97) J5.54@30.75,32.925
CAN2_P: J5.53 U9.7 | length 8.7
  L1 w0.1: v1(30.75,37.12) 30.765,37.135 30.765,37.565 31.3,38.1 34.376,38.1 34.975,37.501 U9.7@34.975,34.9
  L8 w0.1: v1(30.75,37.12) J5.53@30.75,38.075
CAN2_RX: U1.A5 U9.4 | length 12.5
  L1 w0.1: U1.A5@31.9,22.2 33.2,22.2 33.5,22.5 36.2,25.2 v1(36.2,28.8) ; v1(36.25,31.55) 36.25,32.1 U9.4@36.275,32.1
  L6 w0.1: v1(36.2,28.8) 36.225,28.825 36.225,31.525 v1(36.25,31.55)
CAN2_TX: U1.B5 U9.1 | length 15.7
  L1 w0.1: U1.B5@31.1,22.2 31.5,21.8 33.4,21.8 33.5,21.9 36.8,25.2 v1(36.8,28.25) ; U9.1@34.325,32.1 34.35,32.1 v1(34.35,31.55)
  L6 w0.1: v1(34.35,31.55) 35.25,30.65 35.25,28.95 35.95,28.25 v1(36.8,28.25)
CC1: J2.A5 R31.1 | length 1.3
  L1 w0.2: J2.A5@47.873,10.5 v1(49.125,10.5)
CC2: J2.B5 R32.1 | length 1.3
  L1 w0.2: J2.B5@47.873,13.5 v1(49.125,13.5)
COMP_RX: J4.49 U1.F13 | length 9.9
  L1 w0.3: U1.F13@27.9,15.8 v1(28.3,15.4)
  L3 w0.1: v1(28.3,15.4) 28.7,15 29.3,15 29.575,14.725 29.575,12.095 29.875,11.795 29.875,8.475 29.75,8.35 v1(29.75,8.03)
  L8 w0.1: J4.49@29.75,7.075 v1(29.75,8.03)
COMP_TX: J4.50 U1.F14 | length 18.3
  L1 w0.3: U1.F14@27.9,15 v1(28.3,14.6)
  L3 w0.1: v1(28.3,14.6) 28.252,14.648 28.252,14.848 27.9,15.2 27.9,15.6 28.1,15.8 29.3,15.8 29.5,15.6 29.5,15.2 29.7,15 30.1,15 30.3,14.8 30.3,14.2 30.7,13.8 30.7,8.7 30.2,8.2 30.2,7.8 29.75,7.35 v1(29.75,2.88)
  L8 w0.1: J4.50@29.75,1.925 v1(29.75,2.88)
D3V3_FB: R28.1 R29.2 U5.5 | length 2.5
  L1 w0.3: U5.5@40.9,16.05 40.9,15.3 40.475,14.875 40.475,14.55 R29.2@40.425,14.5 R28.1@41.225,14.5
DBG2: TP22.1 U1.H17 | length 3
  L1 w0.1: TP22.1@25.5,9.9 26.3,10.7 U1.H17@26.3,12.6
DEBUG_RX: J4.55 TP11.1 U1.D13 | length 54.6
  L1 w0.1: TP11.1@31.2,6.9 31.225,6.925 31.225,8.875 v1(31.25,8.9)
  L1 w0.3: U1.D13@29.5,15.8 v1(29.9,15.4)
  L6 w0.1: v1(29.9,15.4) 29.5,15.8 28.6,15.8 27.99,16.41 25.59,16.41 24.6,17.4 23.2,17.4 22.8,17.8 21.3,17.8 20.8,17.3 19.1,17.3 18.3,16.5 18.3,10.1 15.6,7.4 15.6,4.9 18.5,2 30.5,2 31.2,2.7 31.2,3 31.8,3.6 31.8,5.1 32.3,5.6 32.3,8.2 32,8.5 31.65,8.5 v1(31.25,8.9)
  L8 w0.2: J4.55@31.25,7.075 v1(31.25,8.9)
DEBUG_TX: J4.56 TP12.1 U1.E12 | length 17.9
  L1 w0.1: TP12.1@31.2,4.8 31.225,4.775 31.225,3.625 v1(31.25,3.6)
  L1 w0.3: U1.E12@28.7,16.6 v1(29.1,16.2)
  L3 w0.1: v1(29.1,16.2) 29.148,16.152 29.348,16.152 29.7,15.8 30.1,15.8 30.3,15.6 30.3,15.2 30.5,15 30.9,15 31.7,14.2 31.7,8.7 31.25,8.25 v1(31.25,3.6)
  L8 w0.2: J4.56@31.25,1.925 v1(31.25,3.6)
DSI_CKN: U1.L17
DSI_CKP: U1.L16
DSI_D0N: U1.M17
DSI_D0P: U1.M16
DSI_D1N: U1.K17
DSI_D1P: U1.K16
DVDT: C77.1 U14.7 | length 1.3
  L8 w0.3: U14.7@39.3,11.2 40.15,11.2 40.4,11.45 C77.1@40.4,11.5
EEPROM_WC: R14.1 U1.U9 U7.7 | length 17
  L1 w0.1: v1(15.7,17.4) 16.9,18.6 18.3,18.6 18.7,19 U1.U9@19.1,19
  L3 w0.1: v1(4.865,13.7) 6.765,15.6 13.9,15.6 v1(15.7,17.4)
  L8 w0.3: v1(4.865,13.7) 4.865,13.21 R14.1@4.9,13.175
ELRS_RX: J4.21 U1.T17 | length 7.1
  L1 w0.1: U1.T17@19.9,12.6 19.9,11.25 v1(21.4,9.75)
  L8 w0.1: v1(21.4,9.75) 21.75,9.4 22.4,9.4 22.75,9.05 J4.21@22.75,7.075
ELRS_TX: J4.20 U1.U16 | length 12.8
  L1 w0.1: U1.U16@19.1,13.4 19.55,12.95 19.55,11.1 22.25,8.4 v1(22.25,3.6)
  L8 w0.2: J4.20@22.25,1.925 v1(22.25,3.6)
ESC_I_SENSE: C76.1 R46.1 U1.U5 | length 1.4
  L1 w0.3: v1(18.7,21.8) U1.U5@19.1,22.2
  L8 w0.3: C76.1@18.46,22.2 C76.1@18.468,22.193 ; R46.1@18.468,21.408 R46.1@18.475,21.4
  L8 w0.4: R46.1@18.468,21.408 C76.1@18.468,22.193
ESC_I_SENSE_F: J4.4 R46.2 | length 22.1
  L3 w0.1: v1(16,14.5) 16,13.9 15.7,13.6 15.7,6.15 v1(18.25,3.6)
  L6 w0.1: v1(16,14.5) 15.676,14.824 15.576,14.824 15.3,15.1 15.3,19.4 v1(16.4,20.5)
  L8 w0.1: v1(16.4,20.5) 17.234,21.334 17.459,21.334 R46.2@17.525,21.4
  L8 w0.2: J4.4@18.25,1.925 v1(18.25,3.6)
ESC_TELEM_RX: J4.18 U1.T14 | length 18.5
  L1 w0.1: v1(17.95,10.25) 17.95,8.75 21.75,4.95 v1(21.75,2.88) ; v1(17.95,16.15) 19.3,16.15 19.45,16 19.45,15.45 U1.T14@19.9,15
  L3 w0.1: v1(17.95,10.25) v1(17.95,16.15)
  L8 w0.1: J4.18@21.75,1.925 v1(21.75,2.88)
ESC_V_SENSE: C72.1 R42.1 U1.T4 | length 3.8
  L1 w0.3: v1(19.5,23.4) U1.T4@19.9,23
  L8 w0.1: R42.1@18.475,24.6 18.475,25.385 C72.1@18.46,25.4 18.46,25.36 18.615,25.205 18.655,25.205 19.5,24.36 v1(19.5,23.4)
ESC_V_SENSE_F: J4.2 R42.2 | length 29.3
  L8 w0.1: R42.2@17.525,24.6 17.5,24.6 16.8,24.6 12.9,20.7 12.9,17.8 11.9,16.8 11.9,5.8 14.7,3 17.125,3 17.75,2.375 J4.2@17.75,1.925
FMU_CH1: J4.28 U1.R16 | length 13.3
  L1 w0.1: U1.R16@20.7,13.4 20.3,13 20.3,11.4 20.7,11 22.7,9 22.7,8.7 23.2,8.2 23.2,6.4 24.25,5.35 v1(24.25,3.6)
  L8 w0.2: J4.28@24.25,1.925 v1(24.25,3.6)
FMU_CH2: J4.29 U1.R17 | length 7.4
  L1 w0.1: U1.R17@20.7,12.6 20.7,12.1 21.8,11 23.8,9 23.8,8.6 24.37,8.03 v1(24.75,8.03)
  L8 w0.1: J4.29@24.75,7.075 v1(24.75,8.03)
FMU_CH3: J4.31 U1.P16 | length 7.9
  L1 w0.1: U1.P16@21.5,13.4 21.9,13 21.9,12.25 v1(25.25,8.9)
  L8 w0.2: J4.31@25.25,7.075 v1(25.25,8.9)
FMU_CH4: J4.32 U1.P15 | length 14.5
  L1 w0.3: v1(21.1,13.8) U1.P15@21.5,14.2
  L6 w0.1: v1(21.1,13.8) 21.1,12.8 22.6,11.3 22.6,11 22.6,9.08 22.625,9.055 22.625,8.745 22.6,8.72 22.6,8.5 22.2,8.1 22.2,6.65 v1(25.25,3.6)
  L8 w0.2: J4.32@25.25,1.925 v1(25.25,3.6)
FMU_CH5: J4.8 U1.P9 | length 21.6
  L1 w0.3: v1(21.1,19.4) U1.P9@21.5,19
  L3 w0.1: v1(19.25,3.6) 19.25,5.25 17.1,7.4 17.1,17.2 17.5,17.6 18.9,19 20.4,19 20.8,19.4 v1(21.1,19.4)
  L8 w0.2: J4.8@19.25,1.925 v1(19.25,3.6)
FMU_CH6: J4.9 U1.P10 | length 12.6
  L1 w0.3: v1(21.1,18.6) U1.P10@21.5,18.2
  L3 w0.1: v1(19.75,8.03) 19.75,11 19.75,13.95 20.425,14.625 20.425,17.925 v1(21.1,18.6)
  L8 w0.1: J4.9@19.75,7.075 v1(19.75,8.03)
FMU_CH7: J4.10 U1.T10 | length 18.2
  L1 w0.1: v1(19.55,18.55) U1.T10@19.9,18.2
  L3 w0.1: v1(19.55,18.55) 18.35,17.35 18.35,6.7 19.75,5.3 v1(19.75,2.88)
  L8 w0.1: J4.10@19.75,1.925 v1(19.75,2.88)
FMU_CH8: J4.11 U1.U10 | length 15.2
  L1 w0.1: v1(15.9,15.8) 15.9,16.7 17.4,18.2 17.5,18.2 U1.U10@19.1,18.2 ; v1(17.55,11.6) v1(20.25,8.9)
  L6 w0.1: v1(15.9,15.8) 17.5,14.2 17.55,14.15 v1(17.55,11.6)
  L8 w0.2: J4.11@20.25,7.075 v1(20.25,8.9)
FMU_CH9: J4.34 U1.N13 | length 16
  L1 w0.3: v1(21.9,15.4) U1.N13@22.3,15.8
  L6 w0.1: v1(21.9,15.4) 22.3,15 22.3,14.2 21.9,13.8 21.9,12.4 22.9,11.4 22.9,11 22.9,9.08 22.875,9.055 22.875,8.745 22.9,8.72 22.9,8.5 23.2,8.2 23.2,6.3 25.75,3.75 v1(25.75,2.88)
  L8 w0.1: J4.34@25.75,1.925 v1(25.75,2.88)
FMU_CH10: J4.35 U1.N15 | length 9.6
  L1 w0.3: U1.N15@22.3,14.2 v1(22.7,14.6)
  L3 w0.1: v1(22.7,14.6) 23.1,14.2 23.1,12.05 24.15,11 v1(26.25,8.9)
  L8 w0.2: J4.35@26.25,7.075 v1(26.25,8.9)
FMU_CH11: J4.36 U1.J14 | length 16.3
  L1 w0.3: U1.J14@25.5,15 v1(25.9,14.6)
  L6 w0.1: v1(25.9,14.6) 25.5,14.2 25.5,11 25.5,9.3 25.7,9.1 25.7,8.7 26.2,8.2 26.2,7.7 27.7,6.2 27.7,3.4 27.4,3.1 27.1,3.1 26.6,3.6 v1(26.25,3.6)
  L8 w0.2: J4.36@26.25,1.925 v1(26.25,3.6)
FMU_CH12: J4.37 U1.B15 | length 13
  L1 w0.1: v1(30.3,11.6) 30.7,12 30.7,13.8 U1.B15@31.1,14.2
  L6 w0.1: v1(26.75,8.03) 27.38,7.4 30.9,7.4 31.2,7.7 31.2,8.3 30.7,8.8 30.7,11.2 v1(30.3,11.6)
  L8 w0.1: J4.37@26.75,7.075 v1(26.75,8.03)
FMU_CH13: J4.23 U1.P13 | length 9.8
  L6 w0.1: v1(21.5,15.8) 22.1,15.8 23.1,14.8 23.1,13.3 23.25,13.15 v1(23.25,8.9)
  L8 w0.2: J4.23@23.25,7.075 v1(23.25,8.9)
FMU_CH14: J4.24 U1.P14 | length 26.1
  L3 w0.1: v1(21.5,15) 22.2,15 22.7,15.5 22.7,18.4 22.1,19 20.9,19 20,18.1 20,17.5 19.5,17 19.5,16.3 19.1,15.9 19.1,11.382 18.8,11.082 18.8,11 18.8,8.05 v1(23.25,3.6)
  L8 w0.2: J4.24@23.25,1.925 v1(23.25,3.6)
FMU_CH15: J4.25 U1.R14 | length 9.2
  L1 w0.3: U1.R14@20.7,15 v1(21.1,14.6)
  L3 w0.1: v1(21.1,14.6) 21.5,14.2 21.5,12 22.5,11 23.75,9.75 v1(23.75,8.03)
  L8 w0.1: J4.25@23.75,7.075 v1(23.75,8.03)
FMU_CH16: J4.26 U1.A16 | length 18.8
  L1 w0.1: v1(23.75,2.88) 24.53,2.1 28.6,2.1 29.2,2.7 29.2,2.9 29.7,3.4 29.7,7.3 30.2,7.8 30.2,8.2 30.7,8.7 30.7,9.068 31.2,9.568 v1(31.2,9.6) ; v1(31.2,11.6) 31.2,11.63 31.5,11.93 31.5,13 U1.A16@31.9,13.4
  L3 w0.1: v1(31.2,9.6) 31.2,11 v1(31.2,11.6)
  L8 w0.1: J4.26@23.75,1.925 v1(23.75,2.88)
FRAM_CS: R13.1 U1.R15 U6.1 | length 16.8
  L1 w0.1: v1(10.095,8.23) 10.095,7.82 10.345,7.57 10.815,7.1 14.3,7.1 14.6,7.4 14.6,11 17.4,13.8 v1(20.3,13.8)
  L1 w0.3: v1(20.3,13.8) U1.R15@20.7,14.2
  L8 w0.3: v1(10.095,8.23) 10.095,8.62 R13.1@10.1,8.625
FRAM_HOLD: R11.1 U6.7 | length 0.4
  L8 w0.2: R11.1@11.175,13.4 11.275,13.5 11.275,13.639 11.365,13.729 v1(11.365,13.77)
FRAM_WP: R12.1 U6.3 | length 0.4
  L8 w0.3: R12.1@12.6,8.625 12.635,8.59 v1(12.635,8.23)
GND: C1.2 C2.2 C3.2 C4.2 C5.2 C6.2 C7.2 C8.2 C9.2 C10.2 C11.2 C12.2 C13.2 C14.2 C15.2 C16.2 C17.2 C18.2 C19.2 C20.2 C21.2 C22.2 C23.2 C24.2 C25.2 C26.2 C27.2 C28.2 C29.2 C30.2 C31.2 C32.2 C33.2 C34.2 C35.2 C36.2 C37.2 C38.2 C39.2 C40.1 C41.2 C42.2 C43.2 C44.2 C45.2 C46.2 C47.2 C48.2 C49.2 C50.2 C51.2 C52.2 C53.2 C54.2 C55.2 C56.2 C57.2 C58.2 C59.2 C60.2 C61.2 C63.2 C64.2 C66.2 C68.2 C69.2 C70.2 C71.2 C72.2 C73.2 C74.2 C75.2 C76.2 C77.2 C78.2 D1.1 D2.1 D3.1 J1.6 J1.9 J1.11 J1.12 J1.13 J1.14 J2.A1B12 J2.B1A12 J2.SH J3.5 J4.1 J4.7 J4.12 J4.19 J4.22 J4.27 J4.30 J4.33 J4.48 J4.57 J4.62 J4.65 J4.66 J4.67 J4.68 J4.69 J4.73 J4.76 J5.1 J5.12 J5.21 J5.29 J5.35 J5.45 J5.51 J5.52 J5.55 J5.58 R5.1 R10.1 R19.2 R26.1 R27.1 R29.1 R31.2 R32.2 R48.2 SW2.2 TP7.1 TP8.1 TP10.1 TP13.1 TP14.1 U1.A1 U1.A17 U1.B2 U1.B6 U1.C10 U1.C13 U1.C16 U1.F2 U1.G7 U1.G8 U1.G9 U1.G10 U1.G11 U1.G16 U1.H7 U1.H8 U1.H9 U1.H10 U1.H11 U1.J3 U1.J7 U1.J8 U1.J9 U1.J10 U1.J11 U1.J16 U1.J17 U1.K7 U1.K8 U1.K9 U1.K10 U1.K11 U1.K15 U1.L7 U1.L8 U1.L9 U1.L10 U1.L11 U1.L15 U1.M15 U1.N1 U1.N16 U1.P1 U1.R4 U1.R8 U1.T12 U1.U1 U1.U17 U2.2 U2.3 U2.6 U2.7 U3.1 U3.7 U4.6 U4.8 U5.2 U6.4 U7.1 U7.2 U7.3 U7.4 U8.2 U8.5 U8.8 U8.9 U9.2 U9.5 U9.8 U9.9 U10.2 U10.3 U10.6 U10.7 U10.10 U10.11 U11.2 U11.3 U12.2 U12.5 U13.1 U14.8 U15.2 X1.2 X1.4 | length 107.1
  L1 w0.2: v1(33.4,34.9) U9.8@34.325,34.9 ; v1(34.2,5.1) 34.212,5.088 34.888,5.088 U8.5@34.9,5.075 ; v1(34.3,2.9) 34.329,2.929 34.554,2.929 34.75,3.125 U8.8@34.9,3.125 ; U9.5@36.275,34.9 36.287,34.913 36.287,35.588 v1(36.3,35.6) ; U8.2@37.7,3.775 38.575,3.775 38.75,3.6 38.83,3.6 39,3.43 v1(39,3)
  L1 w0.3: v1(3.2,19.7) 3.214,19.7 3.265,19.751 U2.3@3.824,19.751 ; v1(3.2,20.3) 3.214,20.3 3.262,20.251 U2.2@3.824,20.251 ; v1(3.225,27.25) C56.2@3.75,27.25 ; v1(4.75,17.475) C45.2@4.75,18 ; C45.2@4.75,18.05 5,18.3 U2.6@5,19.075 ; v1(5.25,28.213) U4.6@5.25,28.738 ; U2.7@5.498,19.075 5.498,18.302 5.75,18.05 C44.2@5.75,18 v1(5.75,17.475) ; U4.8@5.763,29.25 v1(6.287,29.25) ; C54.2@8.25,19.25 v1(8.775,19.25) ; C53.2@8.25,29.75 v1(8.25,30.275) ; C55.2@8.25,31 v1(8.25,31.525) ; v1(10,19.7) 10.014,19.7 10.039,19.725 10.81,19.725 U10.3@10.835,19.75 ; v1(10,20.3) 10.014,20.3 10.039,20.275 10.81,20.275 U10.2@10.835,20.25 ; v1(10.575,17) C71.2@11.1,17 ; v1(11.9,17.5) 11.9,18.189 12,18.289 U10.6@12,19.085 ; v1(12.4,17.8) 12.4,17.814 12.5,17.914 U10.7@12.5,19.085 ; U10.10@13.165,20.25 13.65,20.25 13.787,20.387 14.187,20.387 v1(14.2,20.4) ; U10.11@13.165,20.75 13.19,20.775 13.31,20.775 13.435,20.9 v1(14.2,20.9) ; v1(13.2,16.475) C70.2@13.2,17 ; v1(14.2,16.475) C69.2@14.2,17 ; R10.1@14.25,18.775 v1(14.775,18.775) ; v1(18.7,12.2) U1.U17@19.1,12.6 ; U1.U1@19.1,25.4 v1(19.5,25.8) ; v1(20.3,20.2) U1.R8@20.7,19.8 ; v1(20.3,23.4) U1.R4@20.7,23 ; v1(21.1,25) U1.P1@21.5,25.4 ; v1(21.9,25) U1.N1@22.3,25.4 ; v1(22.7,13.8) U1.M15@23.1,14.2 ; v1(23.5,13.8) U1.L15@23.9,14.2 ; v1(23.5,17) U1.L11@23.9,17.4 ; v1(23.5,17.8) U1.L10@23.9,18.2 ; v1(23.5,20.2) U1.L8@23.9,19.8 ; v1(23.5,21) U1.L7@23.9,20.6 ; v1(24.3,13.8) U1.K15@24.7,14.2 ; v1(24.3,17) U1.K11@24.7,17.4 ; v1(24.3,17.8) U1.K10@24.7,18.2 ; v1(24.3,19.4) U1.K9@24.7,19 ; v1(24.3,20.2) U1.K8@24.7,19.8 ; v1(24.3,21) U1.K7@24.7,20.6 ; U1.J17@25.5,12.6 v1(25.9,12.2) ; U1.J16@25.5,13.4 v1(25.9,13) ; U1.J11@25.5,17.4 v1(25.9,17) ; U1.J10@25.5,18.2 v1(25.9,17.8) ; U1.J9@25.5,19 v1(25.9,19.4) ; U1.J8@25.5,19.8 v1(25.9,20.2) ; U1.J7@25.5,20.6 v1(25.9,21) ; U1.J3@25.5,23.8 v1(25.9,24.2) ; U1.H11@26.3,17.4 v1(26.7,17) ; U1.H10@26.3,18.2 v1(26.7,17.8) ; U1.H9@26.3,19 v1(26.7,19.4) ; U1.H8@26.3,19.8 v1(26.7,20.2) ; U1.H7@26.3,20.6 v1(26.7,21) ; U1.G11@27.1,17.4 v1(27.5,17) ; U1.G8@27.1,19.8 v1(27.5,20.2) ; U1.G7@27.1,20.6 v1(27.5,21) ; U1.F2@27.9,24.6 v1(28.3,24.2) ; U1.C13@30.3,15.8 v1(30.7,15.4) ; U1.C10@30.3,18.2 v1(30.7,17.8) ; U1.A17@31.9,12.6 v1(32.3,12.2) ; U1.A1@31.9,25.4 v1(32.3,25.8) ; v1(34.8,30.475) C49.2@34.8,31 ; C49.2@34.8,31.05 34.975,31.225 U9.2@34.975,32.1 ; D3.1@40,38.1 v1(40,38.525) ; D2.1@43,38.1 v1(43,38.525) ; U15.2@45.39,12.2 v1(46,12.2) ; v1(45.6,28) C59.2@46.2,28 ; D1.1@46,38.1 v1(46,38.525) ; v1(46.1,27) 46.1,26.988 46.37,26.717 U12.2@46.37,26.705 ; R5.1@51.275,26.5 v1(51.7,26.5)
  L8 w0.1: J4.1@17.75,7.075 v1(17.75,8.03) ; v1(17.75,37.12) J5.1@17.75,38.075 ; J4.22@22.75,1.925 v1(22.75,2.88) ; v1(22.75,37.12) J5.21@22.75,38.075 ; J4.30@24.75,1.925 v1(24.75,2.88) ; v1(24.75,37.12) J5.29@24.75,38.075 ; J4.33@25.75,7.075 v1(25.75,8.03) ; v1(28.75,37.12) J5.45@28.75,38.075 ; J4.57@31.75,7.075 v1(31.75,8.03) ; v1(31.75,31.97) J5.58@31.75,32.925 ; J4.62@32.75,1.925 v1(32.75,2.88) ; J4.66@33.75,1.925 v1(33.75,2.88) ; J4.65@33.75,7.075 v1(33.75,8.03) ; v1(33.9,0.8) 34.25,1.15 J4.68@34.25,1.925 ; J4.69@34.75,7.075 v1(34.75,8.03) ; J4.73@35.75,7.075 v1(35.75,8.03) ; v1(36.25,0.97) J4.76@36.25,1.925
  L8 w0.2: v1(10.9,28.4) 10.913,28.413 10.913,28.963 U3.1@10.925,28.975 ; U3.7@11.575,30.425 11.588,30.438 11.588,30.987 v1(11.6,31) ; v1(16.75,16.85) C29.2@17,17.2 ; J4.7@19.25,7.075 v1(19.25,8.9) ; v1(20.2,30) 20.2,30.041 20.25,30.091 J5.12@20.25,32.925 ; J4.12@20.25,1.925 v1(20.25,3.6) ; J4.19@22.25,7.075 v1(22.25,8.9) ; J4.27@24.25,7.075 v1(24.25,8.9) ; v1(26.25,36.47) J5.35@26.25,38.075 ; C34.2@27.1,10.8 27.13,10.8 27.3,10.63 v1(27.3,10.2) ; v1(27.2,27.425) 27.229,27.396 27.229,27.021 27.85,26.4 C1.2@27.9,26.4 ; v1(28.9,10.6) 28.9,11.13 29.07,11.3 C31.2@29.1,11.3 ; J4.48@29.25,1.925 v1(29.25,3.6) ; v1(30.25,31.32) J5.52@30.25,32.925 ; v1(30.25,36.47) J5.51@30.25,38.075 ; v1(31.25,36.47) J5.55@31.25,38.075 ; J4.67@34.25,7.075 v1(34.25,8.9) ; C23.2@34.825,20.2 35.1,20.475 v1(35.1,21) ; R27.1@36.4,11.975 v1(36.4,12.5) ; v1(37.1,12.5) C63.2@37.8,12.5 ; C57.2@39.15,8.5 39.15,8.45 39.32,8.28 39.779,8.28 39.859,8.2 v1(39.9,8.2) ; U14.8@39.3,10.725 41.4,10.725 ; v1(42.9,11.5) 42.929,11.471 42.929,11.246 43.225,10.95 R26.1@43.225,10.9
  L8 w0.3: v1(8.4,21.8) 8.4,21.814 8.675,22.089 U11.3@8.675,23 ; v1(9.9,23.8) 9.91,23.79 9.91,23.015 U11.2@9.925,23 ; v1(10.375,32.9) C51.2@10.9,32.9 ; v1(11.675,32.9) C50.2@12.2,32.9 ; C68.2@12.8,24.6 v1(13.325,24.6) ; C28.2@21.1,10.5 21.213,10.387 21.813,10.387 v1@22.09,10.11 ; v1(22,27.2) 22.05,27.2 22.73,26.52 22.88,26.52 C35.2@23,26.4 v1(24,26.4) 24.05,26.4 24.73,27.08 24.88,27.08 C42.2@25,27.2 ; v1(43.1,8.3) 43.114,8.3 43.154,8.34 43.755,8.34 U13.1@43.765,8.35
  L8 w0.5: C61.2@41.4,9.2 R19.2@41.4,10.2 ; R19.2@41.4,10.225 41.4,10.725 C77.2@41.4,11.5
  other v1: 41.65,1.2 36.3,3.4 36.3,4.1 27.3,4.8 36.3,4.8 45.735,5.37 40.95,6.1 28.25,6.15 13.9,7.8 3.59,7.87 4.86,7.87 6.13,7.87 7.4,7.87 9.45,8.25 46.5,8.35 47.6,8.5 48.2,8.5 13.9,8.6 3.59,8.67 4.86,8.67 6.13,8.67 7.4,8.67 41.4,9.7 22.1,10.1 50.075,10.5 50.9,11.5 49.9,11.525 3.6,12.2 11.2,12.4 22.3,13.4 27.1,13.4 30.3,13.4 50.075,13.5 6.8,13.55 15.45,14.2 39.475,14.5 47.6,15 48.2,15 36.2,15.4 45.1,16.4 45.7,16.4 19.9,16.6 43.2,17 43.8,17 27.1,18.2 34.1,18.4 53,18.6 53.6,18.6 54.2,18.6 17.4,18.98 23.9,19 27.1,19 53,19.3 53.6,19.3 54.2,19.3 12.45,19.75 17.45,20.6 15.05,21 40.6,21.3 41.2,21.3 38.525,21.325 31.1,21.4 17.45,22.25 53.7,23.2 34.1,23.8 17.45,23.85 3.9,23.9 46.2,24.45 14.8,24.6 31.1,24.6 17.45,25.4 31.1,26.1 40.5,26.2 46.7,26.2 41.125,27.6 28.5,27.9 38.525,28.375 33.7,28.7 22.6,28.8 23.7,28.8 25,29.175 36.8,29.55 26.15,30.4 31.1,30.4 23.65,30.6 28.2,31.45 17.3,31.5 38.525,31.525 42.825,32.475 49.75,32.5 52.3,32.5 54.1,32.5 34.6,33.5 35.3,33.5 36,33.5 28.8,34 21.7,34.65 19.65,35.15 27.5,35.7 44.65,36.7 31.3,39.1
GPS1_RX: J4.52 U1.D14 | length 42
  L1 w0.3: U1.D14@29.5,15 v1(29.9,14.6)
  L6 w0.1: v1(29.9,14.6) 29.56,14.6 29.16,15 27.7,15 27.3,15.4 22.9,15.4 21.3,17 19.7,17 19.5,16.8 19.5,16.4 19.1,16 19.1,11 19.1,9.84 18.4,9.14 18.4,7.5 17.7,6.8 17.7,3.2 18.6,2.3 29.8,2.3 30.25,2.75 v1(30.25,3.6)
  L8 w0.2: J4.52@30.25,1.925 v1(30.25,3.6)
GPS1_TX: J4.51 U1.D15 | length 7.8
  L1 w0.3: v1(29.1,13.8) U1.D15@29.5,14.2
  L6 w0.1: v1(29.1,13.8) 29.135,13.8 29.5,13.435 29.5,11 29.5,9.65 v1(30.25,8.9)
  L8 w0.2: J4.51@30.25,7.075 v1(30.25,8.9)
GPS2_RX: J4.53 U1.E15 | length 8.5
  L6 w0.1: v1(28.7,14.2) 28.679,14.179 28.679,13.579 28.3,13.2 28.3,11 28.3,10.4 29.7,9 29.7,8.8 30.1,8.4 30.38,8.4 v1(30.75,8.03)
  L8 w0.1: J4.53@30.75,7.075 v1(30.75,8.03)
GPS2_TX: J4.54 U1.A14 | length 16.1
  L1 w0.1: U1.A14@31.9,15 33.4,13.5 v1(33.4,11.2)
  L3 w0.1: v1(30.75,2.88) 31.259,2.4 31.9,2.4 32.2,2.7 32.2,2.9 32.8,3.5 32.8,7 33.4,7.6 33.4,11 v1(33.4,11.2)
  L8 w0.1: J4.54@30.75,1.925 v1(30.75,2.88)
HSE_IN: C39.1 U1.J2 X1.3 | length 6.8
  L1 w0.1: U1.J2@25.5,24.6 25.9,25 25.9,26.5 26.1,26.7 26.1,28.175 27.1,29.175 X1.3@27.2,29.175 27.475,28.9 C39.1@28.5,28.9
HSE_OUT: C38.1 U1.J1 X1.1 | length 3.7
  L1 w0.1: C38.1@23.7,27.8 24.625,27.8 X1.1@25,27.425 25.5,26.925 U1.J1@25.5,25.4
I2C_AIR_SCL: J4.15 R37.1 U1.U13 | length 10.8
  L1 w0.1: v1(18.7,12.9) 18.3,12.5 18.3,11.85 19.15,11 v1(21.25,8.9)
  L1 w0.3: v1(18.7,15.4) U1.U13@19.1,15.8
  L3 w0.1: v1(18.7,12.9) v1(18.7,15.4)
  L8 w0.1: v1(18.7,15.4) R37.1@19.1,15.77
  L8 w0.2: J4.15@21.25,7.075 v1(21.25,8.9)
I2C_AIR_SDA: J4.16 R38.1 U1.T13 | length 14.5
  L6 w0.1: v1(19.9,15.8) 19.9,11 19.9,9.08 19.875,9.055 19.875,8.745 19.9,8.72 19.9,8.5 20.35,8.05 20.35,6.349 21.25,5.449 v1@21.25,3.53
  L8 w0.2: J4.16@21.25,1.925 v1(21.25,3.6)
I2C_GNSS_SCL: J4.13 R35.1 U1.P11 | length 10.6
  L3 w0.1: v1(20.75,8.03) 20.75,16.65 v1(21.5,17.4)
  L8 w0.1: J4.13@20.75,7.075 v1(20.75,8.03)
I2C_GNSS_SDA: J4.14 R36.1 U1.P12 | length 17.1
  L1 w0.3: v1(21.1,16.2) U1.P12@21.5,16.6
  L6 w0.1: v1(20.75,2.88) 20.75,5.25 19.3,6.7 19.3,8.2 19.6,8.5 19.6,8.72 19.625,8.745 19.625,9.055 19.5,9.18 19.5,11 19.5,16 19.7,16.2 v1(21.1,16.2)
  L8 w0.1: J4.14@20.75,1.925 v1(20.75,2.88)
I2C_INT_SCL: R16.1 TP17.1 U1.P8 U4.1 U7.6 | length 38.9
  L1 w0.1: U4.1@4.237,30.25 3.95,30.25 1.9,28.2 1.9,22.3 1.9,17.2 3.8,15.3 5,15.3 5.9,14.4 5.91,14.4 5.91,13.925 v1(6.135,13.7)
  L1 w0.3: v1(21.1,20.2) U1.P8@21.5,19.8
  L3 w0.1: v1(6.135,13.7) 7.635,15.2 14.1,15.2 18.7,19.8 20.7,19.8 v1(21.1,20.2)
  L8 w0.3: R16.1@6.1,13.175 6.135,13.21 v1(6.135,13.7)
I2C_INT_SDA: R15.1 TP16.1 U1.R9 U4.4 U7.5 | length 35.5
  L1 w0.1: U4.4@4.225,28.75 3.85,28.75 2.5,27.4 2.5,17.2 4,15.7 5.9,15.7 7.18,14.42 7.18,13.925 v1(7.405,13.7)
  L1 w0.3: v1(20.3,19.4) U1.R9@20.7,19
  L3 w0.1: v1(7.405,13.7) 8.505,14.8 14.2,14.8 18.8,19.4 v1(20.3,19.4)
  L8 w0.3: R15.1@7.4,13.175 7.4,13.15 7.4,13.7 v1(7.405,13.7)
I2C_PAY_SCL: J5.30 R39.1 U1.D5 | length 17.4
  L6 w0.1: v1(24.75,31.97) 24.32,32.4 22.4,32.4 22.2,32.2 22.2,31.9 22.405,31.695 22.625,31.475 22.625,29.575 23.1,29.1 23.1,27.9 24,27 26.7,24.3 27.2,24.3 27.9,23.6 27.9,23.2 28.9,22.2 v1(29.5,22.2)
  L8 w0.1: v1(24.75,31.97) J5.30@24.75,32.925
I2C_PAY_SDA: J5.31 R40.1 U1.D4 | length 29.1
  L1 w0.1: v1(29.5,23) 29.9,22.6 29.9,22 30.1,21.8 30.5,21.8 30.7,21.6 30.7,21.2 30.9,21 v1(32.8,21)
  L3 w0.1: v1(25.25,36.47) 25.606,36.452 25.652,36.452 25.681,36.481 26.2,37 26.2,37.3 26.5,37.6 28.9,37.6 29.2,37.3 29.2,36.2 32.7,32.7 32.7,27 32.7,25.1 33.15,24.65 33.15,21.35 v1(32.8,21)
  L8 w0.2: v1(25.25,36.47) J5.31@25.25,38.075
ILIM: R19.1 U14.9 | length 1.1
  L8 w0.2: U14.9@39.3,10.275 40.4,10.275 R19.1@40.425,10.25
IMU1_CS: R22.1 U1.U6 U2.12 | length 16.6
  L1 w0.1: U2.12@5.498,20.925 5.498,21.035 5.688,21.225 R22.1@7.25,21.225 7.3,21.275 7.3,23 7.8,23.5 8.4,23.5 8.9,23 16.2,23 17.5,21.7 17.8,21.4 U1.U6@19.1,21.4
IMU1_INT1: TP15.1 U1.R6 U2.4 | length 24.8
  L1 w0.1: U2.4@3.824,19.251 3.711,19.251 3.289,18.829 v1(3.289,18.801) 2.9,18.412 2.9,17.4 3.8,16.5 TP15.1@5.3,16.5
  L1 w0.3: v1(20.3,21.8) U1.R6@20.7,21.4
  L3 w0.1: v1(3.289,18.801) 9.601,18.801 10.1,19.3 14.2,19.3 16.8,21.9 16.8,22.3 17.1,22.6 17.8,22.6 18.2,22.2 19.9,22.2 v1(20.3,21.8)
IMU2_CS: R34.1 U1.U8 U10.12 | length 9.6
  L1 w0.1: U10.12@12.5,20.915 12.5,21.6 12.8,21.9 14.8,21.9 15.9,20.8 15.9,19.4 16.1,19.2 16.825,19.2 17.375,19.75 R34.1@17.375,19.8 U1.U8@19.1,19.8
IMU2_INT1: TP18.1 U1.P6 U10.4 | length 14.8
  L1 w0.1: TP18.1@9.9,17.5 9.9,18.4 v1(10.3,18.8) 10.3,18.817 10.733,19.25 U10.4@10.835,19.25
  L1 w0.3: v1(21.1,21.8) U1.P6@21.5,21.4
  L3 w0.1: v1(10.3,18.8) 14.1,18.8 16.7,21.4 20.7,21.4 v1(21.1,21.8)
ITIMER: C61.1 U14.10 | length 1.4
  L8 w0.3: U14.10@39.3,9.8 39.85,9.8 40.4,9.25 C61.1@40.4,9.2
J1_GPIO1: J4.42 U1.J15 | length 14.6
  L1 w0.3: v1(25.1,13.8) U1.J15@25.5,14.2
  L3 w0.1: v1(25.1,13.8) 25.5,13.4 26.1,13.4 26.4,13.1 26.4,12.5 27.9,11 27.9,9.9 28.625,9.175 28.625,8.625 28.2,8.2 28.2,7.8 27.75,7.35 v1(27.75,2.88)
  L8 w0.1: J4.42@27.75,1.925 v1(27.75,2.88)
J1_GPIO2: J4.41 U1.K14 | length 9.5
  L1 w0.3: v1(24.3,14.6) U1.K14@24.7,15
  L3 w0.1: v1(24.3,14.6) 24.7,14.2 24.7,12 25.7,11 27.75,8.95 v1(27.75,8.03)
  L8 w0.1: J4.41@27.75,7.075 v1(27.75,8.03)
J1_GPIO3: J4.40 U1.L14 | length 14.6
  L6 w0.1: v1(23.9,15) 23.9,9.4 23.7,9.2 23.7,8.7 24.2,8.2 24.2,6.65 v1(27.25,3.6)
  L8 w0.2: J4.40@27.25,1.925 v1(27.25,3.6)
J1_GPIO4: J4.39 U1.M14 | length 9.6
  L1 w0.3: U1.M14@23.1,15 v1(23.5,14.6)
  L3 w0.1: v1(23.5,14.6) 23.9,14.2 23.9,12.25 25.15,11 v1(27.25,8.9)
  L8 w0.2: J4.39@27.25,7.075 v1(27.25,8.9)
J1_GPIO5: J4.38 U1.N14 | length 15.2
  L1 w0.3: v1(21.9,14.6) U1.N14@22.3,15
  L3 w0.1: v1(21.9,14.6) 21.9,12.1 23,11 24.7,9.3 24.7,8.8 25.3,8.2 25.3,6.9 26.75,5.45 v1(26.75,2.88)
  L8 w0.1: J4.38@26.75,1.925 v1(26.75,2.88)
J1_GPIO6: J4.43 U1.F15 | length 7.5
  L1 w0.3: U1.F15@27.9,14.2 v1(28.3,13.8)
  L6 w0.1: v1(28.25,8.9) 28,9.15 28,11 28,13.5 v1(28.3,13.8)
  L8 w0.2: J4.43@28.25,7.075 v1(28.25,8.9)